# Altium PCB Main_PCB_V1R0_XXXXXX.PcbDoc
Units mil, origin at the board's own origin, x right, y up, seen from the top; angles counter-clockwise.
Board outline 4317.25 x 7815.17 mil, 2 copper layers (Top Layer, Bottom Layer), stack 58.66 mil thick; 91 components, 39 nets, 214 pads, 95 vias.
Unrouted connection lines stored in the file: 3.
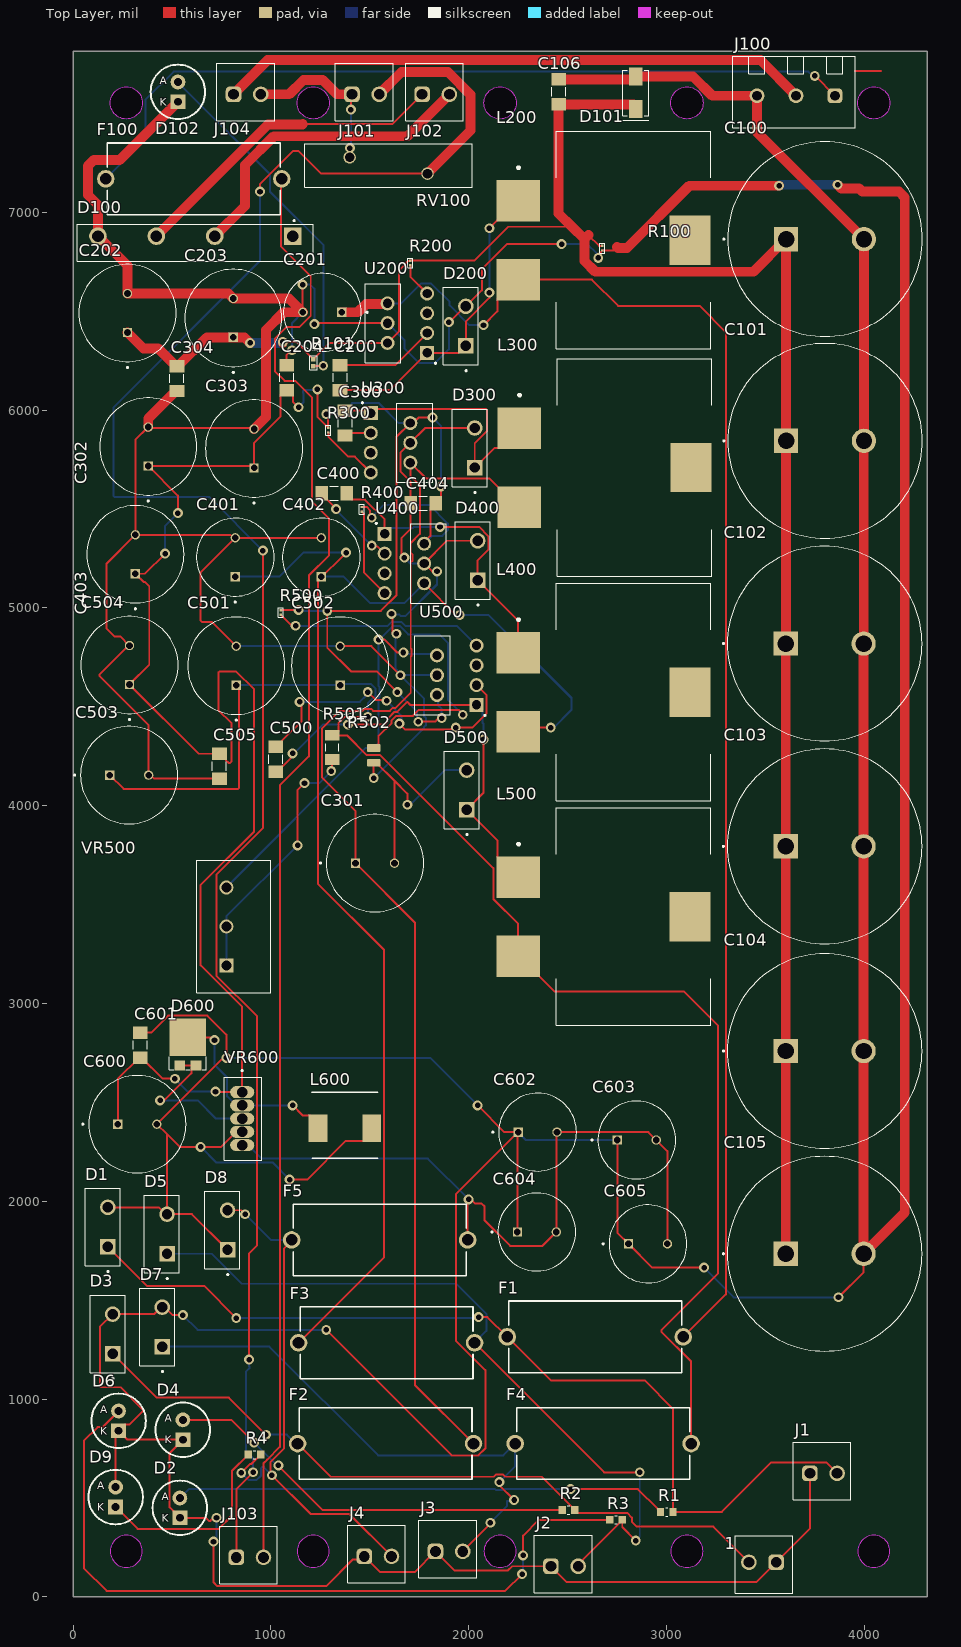
[diagram p0: Top Layer view]
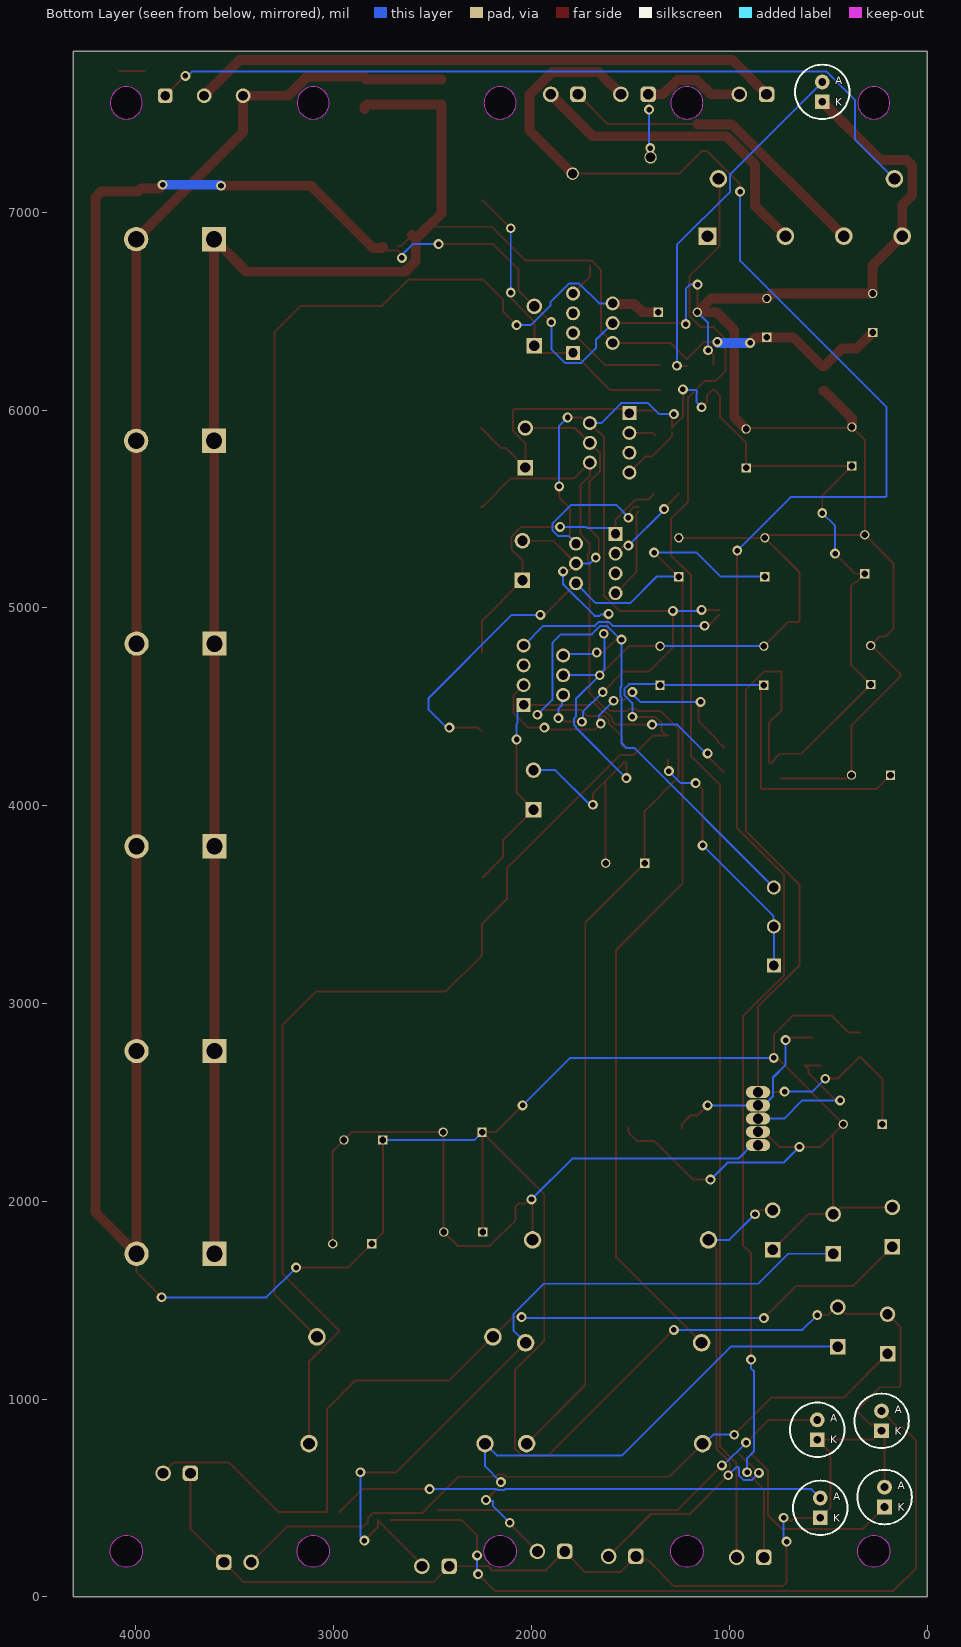
[diagram p1: Bottom Layer view, seen from below]
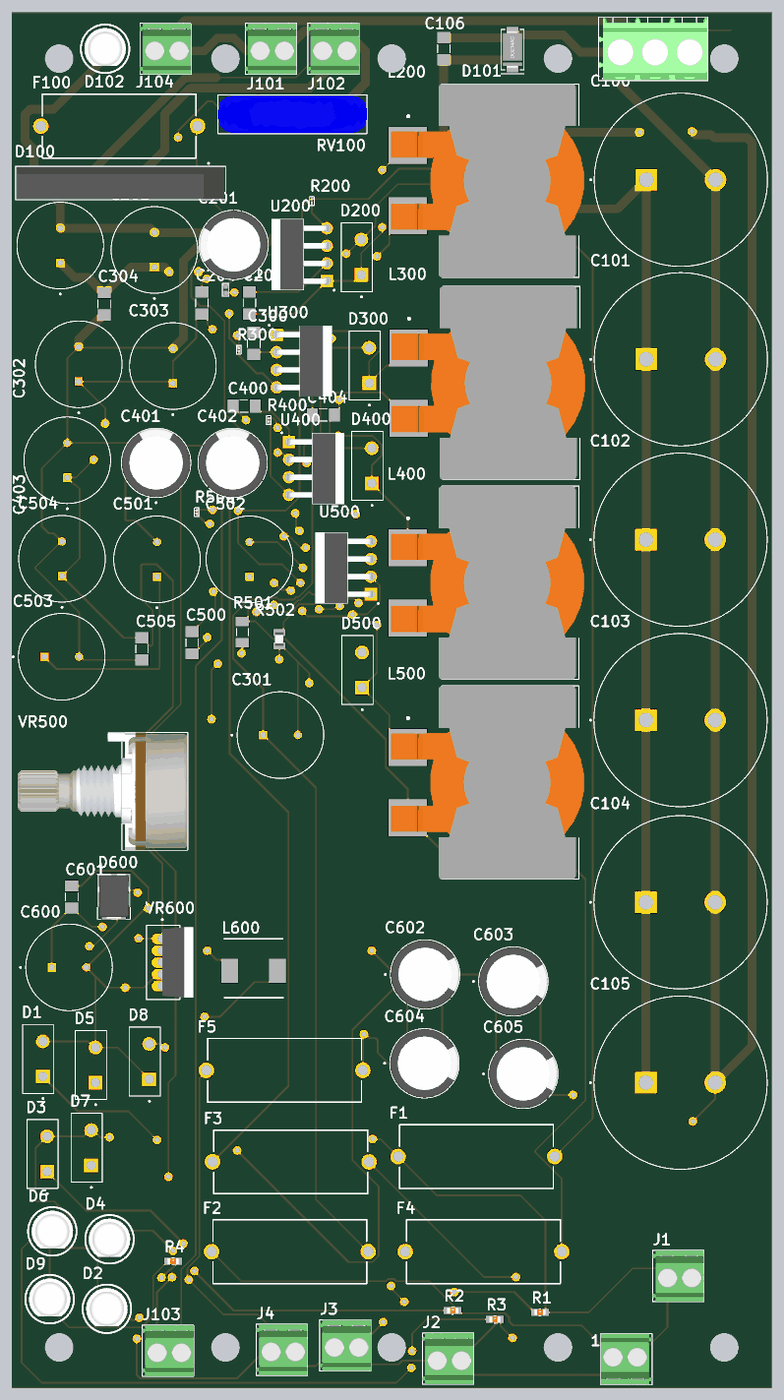
[diagram p2: 3D render of the assembled board from above, using the file's embedded part models]

## Layer stack, top to bottom
Top Solder: solder mask 0.4, Solder Resist, Dk 3.5
Top Layer: signal copper 1.18
Dielectric 1: dielectric 56.3, FR-4, Dk 4.8
Bottom Layer: signal copper 1.18
Bottom Solder: solder mask 0.4, Solder Resist, Dk 3.5

## Board outline
0.25,0.25 4317.5,0.25 4317.5,7815.42 0.25,7815.42
cut-out: 3967.26,230.66 ccw(c4048.64,230.66) 4048.64,149.28 ccw(c4048.64,230.66) 4130.02,230.66 ccw(c4048.64,230.66) 4048.64,312.04 ccw(c4048.64,230.66)
cut-out: 3022.38,230.66 ccw(c3103.76,230.66) 3103.76,149.28 ccw(c3103.76,230.66) 3185.13,230.66 ccw(c3103.76,230.66) 3103.76,312.04 ccw(c3103.76,230.66)
cut-out: 2077.5,230.66 ccw(c2158.87,230.66) 2158.87,149.28 ccw(c2158.87,230.66) 2240.25,230.66 ccw(c2158.87,230.66) 2158.87,312.04 ccw(c2158.87,230.66)
cut-out: 1132.61,230.66 ccw(c1213.99,230.66) 1213.99,149.28 ccw(c1213.99,230.66) 1295.37,230.66 ccw(c1213.99,230.66) 1213.99,312.04 ccw(c1213.99,230.66)
cut-out: 187.73,230.66 ccw(c269.11,230.66) 269.11,149.28 ccw(c269.11,230.66) 350.49,230.66 ccw(c269.11,230.66) 269.11,312.04 ccw(c269.11,230.66)
cut-out: 4048.64,7472.12 cw(c4048.64,7553.49) 3967.26,7553.49 cw(c4048.64,7553.49) 4048.64,7634.87 cw(c4048.64,7553.49) 4130.02,7553.49 cw(c4048.64,7553.49)
cut-out: 3103.76,7472.12 cw(c3103.76,7553.49) 3022.38,7553.49 cw(c3103.76,7553.49) 3103.76,7634.87 cw(c3103.76,7553.49) 3185.13,7553.49 cw(c3103.76,7553.49)
cut-out: 2158.87,7472.12 cw(c2158.87,7553.49) 2077.5,7553.49 cw(c2158.87,7553.49) 2158.87,7634.87 cw(c2158.87,7553.49) 2240.25,7553.49 cw(c2158.87,7553.49)
cut-out: 1213.99,7472.12 cw(c1213.99,7553.49) 1132.61,7553.49 cw(c1213.99,7553.49) 1213.99,7634.87 cw(c1213.99,7553.49) 1295.37,7553.49 cw(c1213.99,7553.49)
cut-out: 269.11,7472.12 cw(c269.11,7553.49) 187.73,7553.49 cw(c269.11,7553.49) 269.11,7634.87 cw(c269.11,7553.49) 350.49,7553.49 cw(c269.11,7553.49)

## Design rules (kind name [scope] priority, off if disabled: settings)
Clearance [All] p1: gap=10 ignorepadtopadclearanceinfootprint=FALSE
PolygonConnect [All] p1: connectstyle=Relief reliefconductorwidth=10 reliefentries=4 polygonreliefangle="90 Angle" airgapwidth=10
RoutingVias [All] p1: holewidth=28 width=50 viastyle="Through Hole" minholewidth=28 minwidth=50 maxholewidth=28 maxwidth=50
SolderMaskExpansion [All] p1: expansion=4 istentingtop=FALSE
SupplyNets "Schematic Supply Nets" [InNet('GND')] p1: voltage=0.000
Width [All] p1: maxlimit=200 minlimit=4 preferedwidth=50
30 further rules are at their usual default settings.

## Classes and differential pairs
component class "DC_DC ADJ": C500 C501 C502 C503 C504 C505 D500 L500 R500 R501 R502 U500 VR500
component class "DC_DC -12V": C600 C601 C602 C603 C604 C605 D600 L600 VR600
component class "DC_DC 12v": C200 C201 C202 C203 C204 D200 L200 R200 U200
component class "DC_DC 5v": C300 C301 C302 C303 C304 D300 L300 R300 U300
component class "DC_DC 3V3": C400 C401 C402 C403 C404 L400 R400 U400
component class "AC_DC CONVERTER": C100 C101 C102 C103 C104 C105 C106 D100 D101 D102 F100 J100 J101 J102 J103 J104 R100 R101 SW100
component class 000_HIERARCHICAL: 1 D1 D2 D3 D4 D5 D6 D7 D8 D9 F1 F2 F3 F4 F5 J1 J2 J3 J4 R1 R2 R3 R4

## Components (designator, comment, footprint, x,y, rotation, side; value= is the part's Value field where it differs from the comment)
1 "Con_2P" CON_2x1_TH_3.5mm_TB 3486.1,175 r180 top
C100 "MAL225638472E3" CAP_MAL225638472E3 3801.85,6865 r0 top
C101 "MAL225638472E3" CAP_MAL225638472E3 3801.85,5845 r0 top
C102 "MAL225638472E3" CAP_MAL225638472E3 3800,4820 r0 top
C103 "MAL225638472E3" CAP_MAL225638472E3 3800,3795 r0 top
C104 "MAL225638472E3" CAP_MAL225638472E3 3800,2760 r0 top
C105 "MAL225638472E3" CAP_MAL225638472E3 3800,1735 r0 top
C106 "100nF 100V" 1206#1 2455,7609.25 r90 top value=100nF
C200 "100nF 100V" 1206#1 1350,6165 r90 top value=100nF
C201 "EEUFR1V331U" CAPPRD500W60D1000H1250 1260,6495 r180 top
C202 "EEUFR1H561B" CAPPRD500W60D1250H2500 275,6491.57 r90 top
C203 "EEUFR1H561B" CAPPRD500W60D1250H2500 810,6466.57 r90 top
C204 "100nF 100V" 1206#1 1080,6165 r90 top value=100nF
C300 "100nF 100V" 1206#1 1375,5935 r270 top value=100nF
C301 "EEUFR1H561B" CAPPRD500W60D1250H2500 1526.57,3710 r0 top
C302 "EEUFR1H561B" CAPPRD500W60D1250H2500 379.99,5816.57 r90 top
C303 "EEUFR1H561B" CAPPRD500W60D1250H2500 915,5806.57 r90 top
C304 "100nF 100V" 1206#1 525,6160 r270 top value=100nF
C400 "100nF 100V" 1206#1 1320,5580 r180 top value=100nF
C401 "EEUFR1V331U" CAPPRD500W60D1000H1250 820,5256.57 r90 top
C402 "EEUFR1V331U" CAPPRD500W60D1000H1250 1255,5256.57 r90 top
C403 "EEUFR1H561B" CAPPRD500W60D1250H2500 314.99,5271.57 r90 top
C404 "100nF 100V" 1206#1 1770,5530 r180 top value=100nF
C500 "100nF 100V" 1206#1 1025,4235 r90 top value=100nF
C501 "EEUFR1H561B" CAPPRD500W60D1250H2500 825,4708.43 r90 top
C502 "EEUFR1H561B" CAPPRD500W60D1250H2500 1350,4708.43 r90 top
C503 "EEUFR1H561B" CAPPRD500W60D1250H2500 283.46,4155 r0 top
C504 "EEUFR1H561B" CAPPRD500W60D1250H2500 285,4711.57 r90 top
C505 "100nF 100V" 1206#1 740,4200 r270 top value=100nF
C600 "EEUFR1H561B" CAPPRD500W60D1250H2500 325,2390 r0 top
C601 "100nF 100V" 1206#1 340,2790 r90 top value=100nF
C602 "EEUFR1V331U" CAPPRD500W60D1000H1250 2348.43,2350 r0 top
C603 "EEUFR1V331U" CAPPRD500W60D1000H1250 2850,2310 r0 top
C604 "EEUFR1V331U" CAPPRD500W60D1000H1250 2345,1845 r0 top
C605 "EEUFR1V331U" CAPPRD500W60D1000H1250 2906.57,1785 r0 top
D1 "MBRF1045" TO508P995X450X1960-2 150,1870 r90 top
D2 "LED" LED_5MM 540,450 r0 top
D3 "MBRF1045" TO508P995X450X1960-2 174.21,1330 r90 top
D4 "LED" LED_5MM 555,845 r0 top
D5 "MBRF1045" TO508P995X450X1960-2 449.21,1835 r90 top
D6 "LED" LED_5MM 230,890 r0 top
D7 "MBRF1045" TO508P995X450X1960-2 425,1365 r90 top
D8 "MBRF1045" TO508P995X450X1960-2 755,1855 r90 top
D9 "LED" LED_5MM 215,505 r0 top
D100 "GBJ2510-F" DIOB_GBJ2510-F 617.87,6846.54 r180 top
D101 "38.9V  10.3A" DO_214AC 2845,7605 r90 top
D102 "LED" LED_5MM 530,7609.25 r0 top
D200 "MBRF1045" TO508P995X450X1960-2 1960,6425 r90 top
D300 "MBRF1045" TO508P995X450X1960-2 2005,5810 r90 top
D400 "MBRF1045" TO508P995X450X1960-2 2020,5240 r90 top
D500 "MBRF1045" TO508P995X450X1960-2 1964.21,4080 r90 top
D600 "SS5P6-M3/86A" TO-277A(SMPC) 580,2795 r0 top
F1 "696101000002" 696101000002 2640,1315 r180 top
F2 "696101000002" 696101000002 1579.88,775 r180 top
F3 "696101000002" 696101000002 1585,1285 r180 top
F4 "696101000002" 696101000002 2679.88,775 r180 top
F5 "696101000002" 696101000002 1550,1805 r180 top
F100 "696101000002" 696101000002 610,7170 r0 top
J1 "12V" CON_2x1_TH_3.5mm_TB 3793.9,625 r0 top
J2 "3V3" CON_2x1_TH_3.5mm_TB 2485,155 r0 top
J3 "VADJ" CON_2x1_TH_3.5mm_TB 1901.1,230 r0 top
J4 "-12V" CON_2x1_TH_3.5mm_TB 1541.1,205 r0 top
J100 "Conn 3POS" CON_3x1_TH_5mm 3655,7590 r180 top
J101 "Con_2P" CON_2x1_TH_3.5mm_TB 1478.9,7597.25 r0 top
J102 "Con_2P" CON_2x1_TH_3.5mm_TB 1833.9,7597.25 r0 top
J103 "Con_2P" CON_2x1_TH_3.5mm_TB 893.9,200 r0 top
J104 "Con_2P" CON_2x1_TH_3.5mm_TB 880,7597.25 r0 top
L200 "SER2918H-333KL" IND_SER2918H-333KL 2815,6860 r270 top
L300 "L1 22uH" IND_SER2918H-333KL 2820.16,5710.2 r270 top
L400 "22uH" IND_SER2918H-333KL 2815,4575 r270 top
L500 "SER2918H-333KL" IND_SER2918H-333KL 2815,3440 r270 top
L600 "100uH 2.5A" L_2SMD_8x8.5x5MM_NS 1238.35,2370 r0 top value=100uH
R1 "2k2 1/10W" 0603 3001.5,430 r0 top value=2k2
R2 "2k2 1/10W" 0603 2505,440 r0 top value=680
R3 "2k2 1/10W" 0603 2745,390 r0 top value=270
R4 "2k2 1/10W" 0603 916.5,720 r0 top value=2k2
R100 "1k 1/20W" 0201 2675,6820 r90 top value=1k
R101 "4k7 1/16W" 0402 1215,6240 r90 top value=4k7
R200 "1k 1/20W" 0201 1705,6745 r90 top value=1k
R300 "1k 1/20W" 0201 1290,5900 r90 top value=1k
R400 "1k 1/20W" 0201 1460,5500 r90 top value=1k
R500 "1k 1/20W" 0201 1050,4977.8 r90 top value=1k
R501 "0R33 3/4W" 1206#2 1310,4295 r90 top value=0.33R
R502 "866" RES_0805 1520,4255 r90 top
RV100 "" VAR_B72220S0301K101 1595,7237.3 r0 top
U200 "LM2678T-12" TO127P1041X469X2199-7N 1590,6440 r90 top
U300 "LM2678T-5" TO127P1041X469X2199-7N 1705,5835 r270 top
U400 "LM2678T-3V3" TO127P1041X469X2199-7N 1775,5225 r270 top
U500 "LM2678-ADJ" TO127P1041X469X2199-7N 1840,4660 r90 top
VR500 "10k 1/5W" Pot_3x1_5mm_TH 775,3390 r180 top value=10k
VR600 "LM2576HVT  -12V" TO170P1067X483X1651-5 855,2418.07 r270 top

## Footprints (in the part's own frame and the unit in brackets; to place one, negate y for a bottom-side part, rotate by r counter-clockwise, add the part's x,y. Pads: shape width x height; smd on the part's side, far side on the other; paste and mask are expansions set on the pad)
0201 [mm] "20211214 / A-F.Romo"
  rect 0.3x0.3 smd: 1(-0.325,0) 2(0.275,0)
  silkscreen extent -0.65,-0.32 0.61,0.33, body extent -0.32,-0.17 0.32,0.17, height 0.27
0402 [mm] "1005 Metric / 20190222 / N-A.Potosi"
  rect 0.6x0.6 smd: 1(-0.45,0) 2(0.45,0)
  silkscreen extent -0.92,-0.47 0.92,0.47, body extent -0.5,-0.25 0.5,0.25, height 0.25
0603 [mil] "1608 Metric / 20190222 / N-A.Potosi"
  rect 37x40 smd: 1(-31.5,0) 2(31.5,0)
  silkscreen extent -6,-21 6,20, body extent -31,-16 32,16, height 12
1206#1 [mm] "3216 Metric / 20190221 / C-A.Serna.A"
  rect 1.6x1.9 smd: 1(-1.6,0) 2(1.6,0)
  silkscreen extent -0.55,-0.9 0.57,0.9, body extent -1.6,-0.8 1.6,0.8, height 2
1206#2 [mm] "3216 metric/ 20190327/ V-A.Patino"
  rect 1.35x1.9 smd: 1(-1.55,0) 2(1.55,0)
  silkscreen extent -0.5,-0.85 0.5,0.85, body extent -1.67,-0.87 1.67,0.87, height 0.75
696101000002 [mm]
  round 2.25 hole 1.5: 1(-11.3,0) 2(11.3,0)
  silkscreen extent -11.1,-4.6 11.1,4.6
CAP_MAL225638472E3 [mm]
  rect 3.116x3.116 / inner round 3.116 / far side rect 3.116x3.116 hole 2.1: 1(-5,0)
  round 3.116 hole 2.1: 2(5,0)
  silkscreen extent -13.1,-12.5 12.5,12.5
CAPPRD500W60D1000H1250 [mm]
  round 1.2 hole 0.85: N(2.5,0)
  rect 1.2x1.2 hole 0.85: P(-2.5,0)
  silkscreen extent -5.85,-5 5,5, body extent -5,-5 5,5, height 12.5
CAPPRD500W60D1250H2500 [mm]
  round 1.2 hole 0.85: N(2.5,0)
  rect 1.2x1.2 / inner round 1.2 / far side rect 1.2x1.2 hole 0.85: P(-2.5,0)
  silkscreen extent -7.1,-6.25 6.25,6.25
CON_2x1_TH_3.5mm_TB [mm] "/ 20190222 / C-A.Serna.A"
  rrect50% 2x2 hole 1.397: 1(-1.75,0)
  round 2 hole 1.397: 2(1.75,0)
  silkscreen extent -3.87,-3.4 3.53,4, body extent -3.87,-3.4 3.53,4, height 8.6
CON_3x1_TH_5mm [mm] "/ 20190222 / C-A.Serna.A"
  rrect50% 1.9x1.9 hole 1.27: 1(-5,0)
  round 1.9 hole 1.27: 2(0,0) 3(5,0)
  silkscreen extent -7.6,-5.08 8.15,4.1, body extent -7.51,-4.99 8.06,4.01, height 11.7
DIOB_GBJ2510-F [mm]
  rect 2.27x2.27 hole 1.51: 1(-12.5,-0.85)
  round 2.27 hole 1.51: 2(-2.5,-0.85) 3(5,-0.85) 4(12.5,-0.85)
  silkscreen extent -15.15,-2.95 15.15,2.4, body extent -15,-2.3 15,2.3, height 24.5
DO_214AC [mm] "SMA / 20190221 / C-A.Serna.A"
  rect 2.3x1.7 smd: 1(-2.1,0) 2(2.1,0)
  silkscreen extent -3.5,-1.66 2.92,1.66, body extent -2.74,-1.4 2.74,1.4, height 2.3
IND_SER2918H-333KL [mm]
  rect 5.33x5.59 smd: 1(-5.075,-14.355) 2(5.075,-14.355)
  rect 6.35x5.28 smd: 3(0,7.72)
  silkscreen extent -13.95,-14.45 13.95,10.36, body extent -13.95,-16.8 13.95,11.14, height 17.78
L_2SMD_8x8.5x5MM_NS [mm] "NS Inductor/20230724/L-A.Rodriguez"
  rect 2.4x3.5 smd: 1(0,0) 2(6.9,0)
  silkscreen extent -0.79,-3.86 7.69,4.62, body extent -0.8,-3.6 7.7,4.4, height 5
LED_5MM [mm]
  round 1.9 hole 1: A(0,1.27)
  rect 1.9x1.9 hole 1: K(0,-1.27)
  silkscreen extent -3.5,-3.5 3.5,3.5, body extent -3,-2.5 3,3, height 21.8
Pot_3x1_5mm_TH [mm] "20190528/ V-A.Patino"
  rect 1.8x1.8 hole 1.27: 1(0,5)
  round 1.8 hole 1.27: 2(0,0) 3(0,-5)
  silkscreen extent -5.7,-8.5 3.8,8.5, body extent -5.64,-8.55 18.86,8.45, height 21
RES_0805 [mm]
  rrect25% 1x1.7 smd: 1(-0.95,0) 2(0.95,0)
  body extent -1,-0.63 1,0.63, height 0.47
TO127P1041X469X2199-7N [mm]
  rect 1.8x1.8 / inner round 1.8 / far side rect 1.8x1.8 hole 1.2: 1(-3.81,-5.08)
  round 1.8 hole 1.2: 2(-2.54,0) 3(-1.27,-5.08) 4(0,0) 5(1.27,-5.08) 6(2.54,0) 7(3.81,-5.08)
  silkscreen extent -5.25,-6.25 5.08,2.86, body extent -5.08,-5.27 5.08,2.87, height 20.9
TO170P1067X483X1651-5 [mm]
  oval 1.55x3.1 hole 1.34: 1(-3.4,0) 2(-1.7,0) 3(0,0) 4(1.7,0) 5(3.4,0)
  silkscreen extent -6.27,-2.29 5.34,2.54, body extent -5.08,0 5.08,4.45, height 16.84
TO508P995X450X1960-2 [mm]
  rect 1.995x1.995 hole 1.33: 1(-2.54,-0.655)
  round 1.995 hole 1.33: 2(2.54,-0.655)
  silkscreen extent -5.82,-2.25 4.97,2.25
TO-277A(SMPC) [mm]
  rect 1.4x1.3 smd: A1(-1.04,-2.725) A2(1.04,-2.725)
  rect 4.72x4.8 smd: K(0,0.875)
  silkscreen extent -2.37,-3.32 2.37,-1.63, body extent -2.3,-3.25 2.3,3.25, height 1.2
VAR_B72220S0301K101 [mm]
  round 1.6 hole 1.25: 1(-5,1.05) 2(5,-1.05)
  silkscreen extent -10.75,-2.8 10.75,2.8, body extent -10.75,-2.7 10.75,2.7, height 25.5

## Part data
1 J1 J2 J3 J4 J101 J102 J103 J104: library part Con_2x1_TH_3.5mm, "TERM BLK 2POS SIDE ENT 3.5MM PCB", Manufacturer="Würth Elektronik", Manufacturer Part Number=691214110002, Supplier Part Number 1=732-2747-ND, ComponentLink1Description=Digi-key, ComponentLink1URL=https://www.digikey.com/product-detail/en/wurth-electronics-inc/691214110002/732-2747-ND/2508516, Last modified by=J.Jaramillo, Last modified date=20240310, Reel Stock=N/A, Supplier 1=Digi-Key
C100 C101 C102 C103 C104 C105 C202 C203 C301 C302 C303 C403 C501 C502 C503 C504 C600 D1 D3 D5 D7 D8 D200 D300 D400 D500 F1 F2 F3 F4 F5 F100: Package=None, Availability=Unavailable, Price=None
  C100 C101 C102 C103 C104 C105: MP=MAL225638472E3
  C202 C203 C301 C302 C303 C403 C501 C502 C503 C504 C600: MF="{'manufacturer': u'Panasonic Electronic Components'}", MP=EEUFR1H561B
  D1 D3 D5 D7 D8 D200 D300 D400 D500: MP=MBRF1045
  F1 F2 F3 F4 F5 F100: MF="{'manufacturer': u'W\xfcrth Elektronik'}", MP=696101000002
C106 C200 C204 C300 C304 C400 C404 C500 C505 C601: library part Cap_0.1uF_1206_100V, "CAP CER 0.1UF 100V X7R 1206", Manufacturer="Samsung Electro-Mechanics", Manufacturer Part Number=CL31B104KCFNNNE, Supplier Part Number 1=1276-1151-1-ND, ComponentLink1Description=Digi-Key, ComponentLink1URL=https://www.digikey.com/en/products/detail/samsung-electro-mechanics/CL31B104KCFNNNE/3886809, Last modified by=J.Jaramillo, Last modified date=20240309, Supplier 1=Digi-Key
C201 C401 C402 C602 C603 C604 C605: "CAP ALUM 330UF 20% 35V RADIAL TH", Package="RADIAL-2 Panasonic", Availability="In Stock", Check_prices=https://www.snapeda.com/parts/EEUFR1V331U/Panasonic/view-part/?ref=eda, MF=Panasonic, MP=EEUFR1V331U, Price=None, Purchase-URL=https://pricing.snapeda.com/search/part/EEUFR1V331U/?ref=eda, SnapEDA_Link=https://www.snapeda.com/parts/EEUFR1V331U/Panasonic/view-part/?ref=snap
D2 D4 D6 D9 D102: library part LED_5MM_GENERIC_THT, "5mm LED Generic THT"
D100: "Bridge Rectifier Single Phase Standard 1 kV Through Hole GBJ", Package="SIP-4 Diodes Incorporated", Check_prices=https://www.snapeda.com/parts/GBJ2510-F/Diodes+Inc./view-part/?ref=eda, Digi-Key_Part_Number=GBJ2510-FDI-ND, MF="Diodes Inc.", MP=GBJ2510-F, Purchase-URL=https://pricing.snapeda.com/search/part/GBJ2510-F/?ref=eda, SnapEDA_Link=https://www.snapeda.com/parts/GBJ2510-F/Diodes+Inc./view-part/?ref=snap
D101: library part TVS_38.9V_1CH_DO_214AC, "TVS DIODE 24VWM 38.9VC SMA", Manufacturer="Bourns Inc.", Manufacturer Part Number=SMAJ24CA, Supplier Part Number 1=SMAJ24CABCT-ND, ComponentLink1Description=Digi-Key, ComponentLink1URL=https://www.digikey.com/en/products/detail/bourns-inc/SMAJ24CA/2254533, Last modified by=J.Jaramillo, Last modified date=20220603, Reel Sotck=N/A, Supplier 1=Digi-Key
D600: "Diode,Schottky Barrier,Vr 60V,If 5A,Pkg TO-277A,Vf 0.56V,Cj 200pF,Tj +150degc", Package="TO-277 Vishay", Check_prices=https://www.snapeda.com/parts/SS5P6-M3/86A/Vishay/view-part/?ref=eda, MF="Vishay General Semiconductor", MP=SS5P6-M3/86A, SnapEDA_Link=https://www.snapeda.com/parts/SS5P6-M3/86A/Vishay/view-part/?ref=snap
J100: library part Con_3x1_TH_5.0mm, "TERM BLK 3POS SIDE ENTRY 5MM PCB", Manufacturer="Phoenix Contact", Manufacturer Part Number=1935174, Supplier Part Number 1=277-1578-ND, ComponentLink1Description=Digi-Key, ComponentLink1URL=https://www.digikey.com/product-detail/en/phoenix-contact/1935174/277-1578-ND/568615, Last modified by=J.Jaramillo, Last modified date=20240310, Reel Stock=N/A, Supplier 1=Digi-Key
L200 L500: "INDUCTOR, PWR, 33UH, 28A, 0.1, 10MHZ; Product Range:COILCRAFT - SER2900 Series; Inductance:33ÂµH; Inductance Tolerance:Â± 10%; Inductor Construction:Shielded; DC Resistance Max:2860Âµohm; RMS Current (Irms):28A; Saturation Current (Isat):7A; Case Dimensio", Package=None, Check_prices=https://www.snapeda.com/parts/SER2918H-333KL/Coilcraft/view-part/?ref=eda, MF=Coilcraft, MP=SER2918H-333KL, SnapEDA_Link=https://www.snapeda.com/parts/SER2918H-333KL/Coilcraft/view-part/?ref=snap
L300 L400: library part SER2918H-333KL, "INDUCTOR, PWR, 33UH, 28A, 0.1, 10MHZ; Product Range:COILCRAFT - SER2900 Series; Inductance:33ÂµH; Inductance Tolerance:Â± 10%; Inductor Construction:Shielded; DC Resistance Max:2860Âµohm; RMS Current (Irms):28A; Saturation Current (Isat):7A; Case Dimensio", Package=None, Check_prices=https://www.snapeda.com/parts/SER2918H-333KL/Coilcraft/view-part/?ref=eda, MF=Coilcraft, MP=SER2918H-333KL, SnapEDA_Link=https://www.snapeda.com/parts/SER2918H-333KL/Coilcraft/view-part/?ref=snap
L600: library part L_100uH_2.5A_NS, "2.5A 100uH ±20% 3A SMD,8x8.5mm Power Inductors ROHS", Manufacturer="PROD Tech", Manufacturer Part Number=PSPMAA0805-101M-ANP, Supplier Part Number 1=C2962892, ComponentLink1Description=Digi-Key, ComponentLink1URL=https://www.digikey.com/en/products/detail/bourns-inc/SRR1280-101M/2127044, Last modified by=J.Jaramillo, Last modified date=20240310, Reel Stock=N/A, Supplier 1=LCSC
R1 R2 R3 R4: library part Res_2k2_0603_1/10W, "RES SMD 2.2K OHM 1% 1/10W 0603", Manufacturer=Yageo, Manufacturer Part Number=RC0603FR-072K2L, Supplier Part Number 1=311-2.20KHRCT-ND, ComponentLink1Description=Digi-Key, ComponentLink1URL=https://www.digikey.com/en/products/detail/yageo/RC0603FR-072K2L/727016?s=N4IgTCBcDaIEoGEAMA2JBmAYnAtEg7GANJgAyIAugL5A, Last modified by=J.Jaramillo, Last modified date=20240310, Reel Stock=N/A, Supplier 1=Digi-Key
R100 R200 R300 R400 R500: library part Res_1k_0201_1/20W, "RES 1K OHM 1% 1/20W 0201", Manufacturer=YAGEO, Manufacturer Part Number=RC0201FR-071KL, Supplier Part Number 1=311-1KMCT-ND, ComponentLink1Description=Digi-Key, ComponentLink1URL=https://www.digikey.com/en/products/detail/yageo/RC0201FR-071KL/3202389?s=N4IgTCBcDaIMwEYEFoEGkCyBhAKsgcgCIgC6AvkA, Last modified by=J.Jaramillo, Last modified date=20240310, Reel Stock=N/A, Supplier 1=Digi-Key
R101: library part Res_4k7_0402_1/16W, "RES SMD 4.7K OHM 5% 1/16W 0402", Manufacturer=Yageo, Manufacturer Part Number=RC0402JR-074K7L, Supplier Part Number 1=311-4.7KJRCT-ND, ComponentLink1Description=Digi-Key, ComponentLink1URL=https://www.digikey.com/product-detail/en/yageo/RC0402JR-074K7L/311-4-7KJRCT-ND/729424, Last modified by=J.Jaramillo, Last modified date=20240310, Reel Stock=N/A, Supplier 1=Digi-Key
R501: library part Res_0R33_1206_3/4W, "RES 0.33 OHM 1% 3/4W 1206", Manufacturer=Susumu, Manufacturer Part Number=KRL1632E-M-R330-F-T5, Supplier Part Number 1=408-1588-1-ND, ComponentLink1Description=Digi-key, ComponentLink1URL=https://www.digikey.com/products/en?keywords=408-1588-1-ND, Last modified by=J.Jaramillo, Last modified date=20240310, Reel Stock=N/A, Supplier 1=Digi-Key
R502: library part RES_0805, "Resistor SMD 0805"
RV100: library part B72220S0301K101, "Varistor: metal-oxide; THT; 300VAC; 385VDC; 470V; 8000A; 173J", Package="Disc-20 EPCOS - TDK Electronics", Check_prices=https://www.snapeda.com/parts/B72220S0301K101/EPCOS/view-part/?ref=eda, MF=EPCOS, MP=B72220S0301K101, SnapEDA_Link=https://www.snapeda.com/parts/B72220S0301K101/EPCOS/view-part/?ref=snap
U200 U300 U400 U500: library part LM2678T-ADJ, "8V to 40V, 5A SIMPLE SWITCHER buck converter with high efficiency 7-TO-220 -40 to 125", Package="TO-220-7 Texas Instruments", Check_prices=https://www.snapeda.com/parts/LM2678T-ADJ/Texas+Instruments/view-part/?ref=eda, MF="Texas Instruments", MP=LM2678T-ADJ, SnapEDA_Link=https://www.snapeda.com/parts/LM2678T-ADJ/Texas+Instruments/view-part/?ref=snap
VR500: library part Pot_10k_1/5W_TH, "POT 10K OHM 1/5W PLASTIC LINEAR", Manufacturer="TT Electronics/BI", Manufacturer Part Number=P160KN-0QC15B10K, Supplier Part Number 1=987-1301-ND, ComponentLink1Description=Digi-key, ComponentLink1URL=https://www.digikey.com/products/en?keywords=P160KN-0QC15B10K, Last modified by=J.Jaramillo, Last modified date=20240310, Reel Stock=N/A, Supplier 1=Digi-Key
VR600: library part LM2576HVT-ADJ/NOPB, "SIMPLE SWITCHERÂ® 4V to 60V, 3A Low Component Count Step-Down Regulator", Package="TO-220-5 Texas Instruments", Check_prices=https://www.snapeda.com/parts/LM2576HVT-ADJ/NOPB/Texas+Instruments/view-part/?ref=eda, MF="Texas Instruments", MP=LM2576HVT-ADJ/NOPB, SnapEDA_Link=https://www.snapeda.com/parts/LM2576HVT-ADJ/NOPB/Texas+Instruments/view-part/?ref=snap

## Via types
v1: diameter 50, hole 28, Top Layer to Bottom Layer, 95 vias

## Nets (pads, with @x,y where several pads share a name; then routed paths per layer and width w, separated by ;. In a path a pad name is that pad's centre, name@x,y a point inside that pad or via, vN(x,y) a via of type N, cw(c..) or ccw(c..) an arc to the next point about the centre after c; other vN are vias at no path point)
3V3_INT: C401.P C402.P F3.2 L400.2 U400.6 | length 6967.5
  Top Layer w10: F3.2 1572.24,1717.13 1572.24,3270.67 1237.6,3605.32 1237.6,5137.6 v1(1380,5280) ; U400.6 1940.86,4959.14 1949.14,4959.14 v1(1955,4965) ; L400.2 2269.65,4395 v1(2415,4395)
  Bottom Layer w10: C401.P 1042.97,5158.15 1164.82,5280 v1(1380,5280) ; C402.P 1367.96,5158.15 1501.55,5024.57 1674.57,5024.57 U400.6 ; v1(1955,4965) 2100,4965 2520,4545 2520,4485 2426.64,4391.64 2418.36,4391.64 v1(2415,4395)
GND: 1.1 C100.2 C101.2 C102.2 C103.2 C104.2 C105.2 C106.2 C201.N C202.N C203.N C204.2 C301.N C302.N C303.N C304.2 C401.N C402.N C403.N C404.2 C501.N C502.N C503.N C504.N C505.2 C600.N C601.2 C602.P C603.P C604.P C605.P D1.2 D2.K D3.2 D4.K D5.2 D6.K D7.2 D8.1 D9.A D100.4 D101.2 D102.K D200.2 D300.2 D400.2 D500.2 J1.1 J2.1 J3.1 J4.1 J100.3 L600.2 R100.1 R502.1 U200.4 U300.4 U400.4 U500.4 VR600.4 | length 48532.3
  Top Layer w10: D1.2 433.25,1970 468.25,1935 D5.2 ; D9.A 215,825 D6.K ; C601.2 394.94,2853 480.87,2938.94 679.13,2938.94 775,2843.06 v1(775,2725) 758.43,2725 C600.N 475,2338.43 ; v1(555,1425) 502.85,1425 462.85,1465 D7.2 444.04,1465 409.04,1430 D3.2 135,1365 135,1065.86 140.86,1060 240.3,1060 352.98,947.33 352.98,939.04 286.34,872.4 262.4,872.4 D6.K ; v1(710,280) 710,75 730,55 1280,55 1415.31,190.31 1457.52,190.31 J4.1 1552.2,125 1727.2,125 J3.1 1927.92,134.28 2198.8,134.28 2219.51,155 J2.1 2496.1,75 3455,75 1.1 3725,345 J1.1 ; v1(725,400) 717.35,392.35 702.35,392.35 694.14,384.14 685.86,384.14 670,400 D2.K 487.6,452.4 487.6,727.6 D4.K 275,795 D6.K ; C505.2 409.97,4137 391.97,4155 C503.N 381.89,4408.11 134.14,4655.86 134.14,4664.14 280,4810 C504.N 238.94,4856.06 208.94,4856.06 170,4895 170,5225.01 C403.N ; D8.1 600.79,1935 D5.2 ; C501.N 701.85,4930 650.86,4930 645,4935.86 645,5180 C401.N ; VR600.4 824.49,2351.14 748.35,2275 v1(645,2275) 538.43,2275 475,2338.43 ; C303.N 910,5910 384.99,5910 C302.N 314.99,5850 C403.N ; C204.2 1080,6280 1103.37,6303.37 v1(1107.52,6303.37) ; v1(1095,2110) 1183.33,2110 1379.43,2306.1 1467.76,2306.1 1510,2348.35 L600.2 ; v1(1160,6635) 1160.79,6634.21 1160.79,6495.79 C201.N ; v1(1220,6435) 1225,6440 U200.4 ; C402.N C401.N ; v1(1280,1350) 1914.29,715.71 2049.32,715.71 2084.06,750.44 2084.06,1146.98 1935.59,1295.44 1935.59,2035.59 C602.P@2246.57,2346.57 ; C502.N 1508.15,4806.85 v1(1655,4660) ; v1(1520,4140) R502.1 1533.78,4217.6 1625,4126.38 ; v1(1609.95,4970) 1615,4964.95 1615,4870 v1(1635,4870) ; C301.N 1625,4126.38 ; v1(1675,5255) 1665.86,5255 1660,5260.86 1660,5352.8 1707,5399.8 C404.2 1707,5639.03 1654.57,5691.46 1654.57,5784.57 U300.4 1780,5910 D300.2 ; v1(1690,4005) 1690,4061.38 1625,4126.38 ; v1(1840,5185) 1815,5185 U400.4 1890,5340 D400.2 ; v1(1900,6445) 1902.89,6445 1982.89,6525 D200.2 2066.25,6605.46 2066.25,6712.77 2193.47,6840 v1(2470,6840) ; v1(2045,2485) 2180,2350 C602.P C602.P@2246.57,2346.57 ; C604.P C602.P@2246.57,2346.57 ; v1(2654.93,6769.93) 2662.58,6777.58 2662.58,6794.78 R100.1 2732.2,6807.2 2750,6825 ; C603.P 2751.57,1841.57 C605.P 2928.15,1665 v1(3190,1665) ; v1(3870,1515) 3996.85,1641.85 C105.2 ; C403.N 794.92,5370 809.92,5355 C401.N ; D5.2 475,2338.43
  Top Layer w50: C302.N 379.99,5957.89 519.1,6097 C304.2 ; D102.K 235.75,7265 104.29,7265 75,7235.71 75,7088.56 125.75,7037.81 D100.4 275,6730.75 C202.N 785,6590 C203.N 1091.57,6565 C201.N@1160.79,6495.79 ; C303.N 975,5965 975,6405 1065,6495 C201.N ; C106.2 2836.54,7672.25 2845,7680.72 D101.2 3134.16,7687.68 3231.83,7590 J100.3 3458.15,7405.55 C100.2 C101.2 3997.78,5844.07 3997.78,4820.93 C102.2 C103.2 C104.2 C105.2 4205,1943.15 4205,7075.71 4175.71,7105 3990,7105 3975,7120 3885,7120 v1(3865,7140) ; 2750,6825 2755,6820 2800.5,6820 3115.5,7135 v1(3570,7135)
  Bottom Layer w10: v1(555,1425) 630,1350 v1(1280,1350) ; v1(645,2275) 723.67,2196.33 1008.67,2196.33 v1(1095,2110) ; v1(710,280) 725,295 v1(725,400) ; v1(775,2725) 1805,2725 v1(2045,2485) ; C501.N C502.N ; v1(1107.52,6303.37) 1107.52,6440.95 C201.N ; v1(1160,6635) 1200,6635 1220,6615 v1(1220,6435) ; v1(1520,4140) 1775,4395 1775,4398.43 1785,4408.43 1785,4441.57 1775,4451.57 1775,4540 v1(1655,4660) ; U200.4 1675,6355 1675,6312.92 1748.35,6239.57 1831.65,6239.57 1900,6307.92 v1(1900,6445) ; v1(1609.95,4970) 1613.85,4966.1 1649.95,4966.1 1656.05,4960 1681.32,4960 1840,5118.68 v1(1840,5185) ; v1(1635,4870) 1630,4865 1630,4691.57 1655,4666.57 v1(1655,4660) ; v1(1675,5255) 1705,5225 U400.4 ; v1(1690,4005) 1693.36,4001.64 1701.64,4001.64 1880,4180 D500.2 ; U500.4 v1(1655,4660) ; C602.P 2290,2310 C603.P ; v1(2470,6840) 2600,6840 2647.27,6792.73 2647.27,6777.58 v1(2654.93,6769.93) ; v1(3190,1665) 3340,1515 v1(3870,1515)
  Bottom Layer w50: v1(3570,7135) 3575,7140 v1(3865,7140)
Net1_2: 1.2 D3.1 F2.2 R2.2 | length 3677.3
  Top Layer w10: D3.1 422.14,1007.86 787.14,1007.86 v1(975,820) ; F2.2 1302.52,607.48 2125.91,607.48 2138.43,620 2171.57,620 2184.09,607.48 2370.52,607.48 2536.5,441.5 R2.2 ; R2.2@2536.5,438.5 2550,425 2801.21,425 2825.61,400.61 2825.61,379.39 2850,355 3237.2,355 1.2
  Bottom Layer w10: v1(975,820) 1080.84,820 1125.84,775 F2.2
NetC100_1: C100.1 C101.1 C102.1 C103.1 C104.1 C105.1 C106.1 C202.P C203.P C204.1 C302.P C303.P C304.1 C403.P C404.1 C504.P C505.1 C600.P C601.1 D100.1 D101.1 R100.2 R101.2 R200.2 R300.2 R400.2 R500.2 U200.2 U300.2 U400.2 U500.2 VR600.1 | length 22676.7
  Top Layer w10: C600.P 226.57,2619.49 334.09,2727 C601.1 345.9,2727 452.91,2620 v1(515,2620) ; v1(465,5275) 363.15,5173.15 C403.P 355.88,5132.26 362.74,5132.26 385,5110 385,4713.15 C504.P 635.15,4263 C505.1 745.91,4263 772.41,4236.5 772.41,4230.59 785.86,4217.14 794.14,4217.14 800,4223 800,4419 735,4484 735,4674.14 740.86,4680 823.46,4680 915,4588.46 915,3870 645,3600 645,3192.75 855,2982.75 VR600.1 853.46,2553.46 721.54,2553.46 v1(720,2555) ; v1(530,5480) 530,5568.14 C302.P 905,5718.15 C303.P 915,5834.84 1047.59,5967.44 1047.59,6075.51 1074.09,6102 C204.1 1085.22,6102 1111.72,6075.51 1111.72,6043.28 v1(1140,6015) ; R500.2 1050.69,4989.31 1139.31,4989.31 v1(1140,4990) ; v1@1060,6340 1065,6345 1127.72,6345 R101.2 1297.28,6340 U200.2 1648.17,6398.17 1648.17,6708.4 1694.69,6754.92 1704.09,6754.92 R200.2 2028.37,6755.83 2200.04,6927.5 2522.5,6927.5 ; v1(1235,6105) 1235,5965.83 R300.2 1290,5959.18 1280,5969.18 v1(1280,5980) ; R400.2 1483.91,5510.83 1502.35,5492.39 1502.35,5464.11 v1(1510,5456.46) ; v1(1640,4575) 1535,4680 1405,4680 1285,4800 v1(1285,4985) 1556.32,4985 1634.57,5063.24 1634.57,5864.57 U300.2 1720.03,5935 1748.18,5963.15 v1(1817.6,5963.15) ; v1(1745,4425) 1830,4425 1840,4435 1855.29,4435 v1(1863.75,4443.46) ; U400.2 1775,5333.32 1806.5,5364.82 1806.5,5503.5 C404.1 1859.49,5556.49 1859.49,5574.49 1860,5575 v1(1860,5615) ; 2605,6885 2659.17,6830.83 R100.2
  Top Layer w50: C202.P 356.83,6311.32 430.77,6311.32 519.1,6223 C304.1 530.91,6223 676.06,6368.15 C203.P 866.85,6368.15 v1(895,6340) ; v1@1060,6340 v1(1060,6345) ; 2605,6885 2585,6865 ; D101.1 2845,7534.13 2832.88,7546.25 C106.1 2455,6995 2522.5,6927.5 2585,6865 ; C105.1 C104.1 C103.1 C102.1 3604.07,4820.93 3604.07,5844.07 C101.1 C100.1 3440,6700 2640,6700 2585,6755 2585,6865
  Bottom Layer w10: v1(465,5275) 465,5415 v1(530,5480) ; v1(515,2620) 580,2555 v1(720,2555) ; v1(1140,4990) 1145,4985 v1(1285,4985) ; v1(1140,6015) 1165,6040 1165,6085 1162.14,6087.86 1162.14,6096.15 1168,6102 1232,6102 v1(1235,6105) ; v1(1280,5980) 1355,5980 1410.86,6035.86 1419.14,6035.86 1419.57,6035.43 1546.65,6035.43 1647.08,5935 U300.2 ; v1@1505,5455 1571.69,5521.69 1799.88,5521.69 1895,5426.57 1895,5393.43 1866.61,5365.04 1815.04,5365.04 U400.2 ; v1@1506.46,5456.46 v1(1510,5456.46) ; v1(1640,4575) 1740,4475 1740,4430 v1(1745,4425) ; v1(1817.6,5963.15) 1860,5920.74 v1(1860,5615) ; U500.2 1845.05,4554.95 1845.05,4509.57 1863.75,4490.86 v1(1863.75,4443.46)
  Bottom Layer w50: v1(895,6340) 1055,6340 v1(1060,6345)
NetC200_1: C200.1 D200.1 L200.1 U200.1 | length 1575.5
  Top Layer w10: C200.1 1602,6102 U200.1 1950.79,6290 D200.1 1985.79,6448.25 2105,6567.46 2105,6594.61 v1(2104.8,6594.81) ; v1(2105,6920) 2105,6920.08 2244.72,7059.8 L200.1
  Bottom Layer w10: v1(2104.8,6594.81) 2104.9,6594.91 2104.9,6919.9 v1(2105,6920)
NetC200_2: C200.2 U200.3 | length 507.1
  Top Layer w10: C200.2 1628,6228 U200.3
NetC201_P: C201.P F1.1 L200.2 U200.6 | length 7508.8
  Top Layer w10: v1(2075,6430) 2144.8,6499.8 2144.8,6560.28 2244.72,6660.2 L200.2 2623.23,6660.2 2755.83,6527.6 3167.4,6527.6 3300,6395 3300,1530.12 F1.1
  Top Layer w50: C201.P 1439.35,6495 1480.36,6536.01 1586.01,6536.01 U200.6
  Bottom Layer w10: U200.6 1658.46,6540 1758.9,6640.43 1810.89,6640.43 1903.64,6547.69 1903.64,6530.4 2004.04,6430 v1(2075,6430)
NetC300_1: C300.1 D300.1 L300.1 U300.1 | length 1358.1
  Top Layer w10: C300.1 1492,5998 U300.1 1525.87,6005.87 2087.72,6005.87 2093.58,6000.01 2093.58,5896.04 2030.79,5833.25 D300.1 2130.87,5810.08 2155.08,5810.08 L300.1
NetC300_2: C300.2 U300.3 | length 135.4
  Top Layer w10: C300.2 1388.01,5885 U300.3
NetC301_P: C301.P F2.1 L300.2 U300.6 | length 6320.2
  Top Layer w10: F2.1 1728.25,1071.51 1728.25,3409.9 C301.P 1428.15,3973.44 1257.6,4143.99 1257.6,4388.81 1348.63,4479.84 1463.27,4479.84 1473.43,4490 1506.57,4490 1516.73,4479.84 1601.7,4479.84 1616.86,4495 1631.32,4495 1707.19,4570.87 1707.19,4755.62 1710,4758.43 1710,4791.57 1707.19,4794.38 1707.19,5230.62 1715,5238.43 1715,5271.57 1707.19,5279.38 1707.19,5328.51 1753.49,5374.82 1753.49,5620.82 1705,5669.31 U300.6 1784.27,5655.73 2104.55,5655.73 2249.88,5510.39 L300.2
NetC400_1: C400.1 D400.1 L400.1 U400.1 | length 1577.1
  Top Layer w10: C400.1 1383,5574.09 1409.49,5547.59 1475.43,5547.59 1575,5448.02 U400.1 ; v1(1855,5410) 2052.54,5410 2100.06,5362.48 2100.06,5295.51 2045.79,5241.24 D400.1 2249.84,4935.94 L400.1
  Bottom Layer w10: U400.1 1605.43,5405.43 1718.69,5405.43 1723.26,5410 v1(1855,5410)
NetC400_2: C400.2 U400.3 | length 451.4
  Top Layer w10: C400.2 1257,5574.09 1330,5501.09 v1(1330,5500) ; v1(1510,5315) 1514.71,5310.29 1539.71,5310.29 U400.3
  Bottom Layer w10: v1(1330,5500) 1330,5495 v1(1510,5315)
NetC500_1: C500.1 D500.1 L500.1 U500.1 | length 2214.9
  Top Layer w10: C500.1 1030.9,4172 1102.35,4243.45 1102.35,4257.35 v1(1110,4265) ; v1(1390,4410) 1574.61,4410 1590,4425.39 1590,4439.85 1625.15,4475 1639.61,4475 1689.61,4525 1705.04,4509.57 1914.12,4509.57 1914.56,4510 U500.1 ; v1(2075,4335) 2075,4065 D500.1 2144.8,3825.2 2144.8,3739.72 2244.72,3639.8 L500.1
  Bottom Layer w10: v1(1110,4265) 1117.99,4265 1262.99,4410 v1(1390,4410) ; U500.1 2070.43,4479.57 2070.43,4418.81 2075,4414.24 v1(2075,4335)
NetC500_2: C500.2 U500.3 | length 1579.3
  Top Layer w10: C500.2 1030.9,4298 1057.4,4324.5 1057.4,4330.41 1155,4428.01 1155,4519.14 1149.14,4525 v1(1145,4525) ; v1(1490,4575) 1530,4535 1581.04,4535 v1(1585.09,4530.95) ; v1(1650,4415) 1680,4385 1909.14,4385 1911.49,4387.35 1927.35,4387.35 v1(1935,4395) 2017.08,4395 2090.43,4468.35 2090.43,4559.57 U500.3
  Bottom Layer w10: v1(1145,4525) 1450,4525 1485,4560 1485,4570 v1(1490,4575) ; v1@1585.09,4530.91 1660,4456 1660,4420.86 1654.14,4415 v1(1650,4415)
NetC501_P: C501.P C502.P C503.P F4.1 L500.2 R501.2 | length 7358.9
  Top Layer w10: C503.P 255.04,4085 834.14,4085 840,4090.86 840,4595 C501.P ; R501.2 R501.2@1320.83,4356.02 ; v1(1490,4450) 1373.43,4450 1342.4,4418.97 1342.4,4377.6 R501.2@1320.83,4356.02 ; F4.1 3124.76,1190.24 2974.14,1340.86 2974.14,1349.14 3260,1635 3260,2890 3090,3060 2435.16,3060 2254.96,3240.2 L500.2 2249.84,3403.63 2124.8,3528.67 2124.8,3684.28 1551.36,4257.72 1483.2,4257.72 1384.9,4356.02 R501.2@1320.83,4356.02
  Bottom Layer w10: C501.P C502.P 1355,4615 1506.57,4615 1530,4591.57 1530,4558.43 1490,4518.43 v1(1490,4450)
NetC602_N: C602.N C603.N C604.N C605.N D600.A1 D600.A2 F5.1 VR600.3 VR600.5 | length 4450.4
  Top Layer w10: v1(440,2510) 461.57,2510 598.39,2646.82 598.39,2667.13 618.98,2687.72 D600.A2 D600.A1 ; F5.1 1994.88,2004.88 v1(2000,2010) 2010.82,2010 2032.62,1988.2 2065.94,1988.2 2080,1974.14 2080,1905 2210,1775 2373.43,1775 C604.N 2445.14,1846.71 2445.14,2348.29 C602.N 2908.43,2350 C603.N 3005,2253.43 C605.N
  Bottom Layer w10: v1(440,2510) 630,2510 720,2420 853.07,2420 VR600.3 ; VR600.5 885.51,2284.21 953.4,2216.33 1793.67,2216.33 v1(2000,2010)
NetD1_1: D1.1 F1.2 J1.2 R1.2 | length 4678.3
  Top Layer w10: D1.1 372.92,1572.86 662.14,1572.86 v1(825,1410) ; v1(2050,1415) 2095.12,1415 F1.2 2415.12,1095 2890,1095 3033,952 R1.2 3280,430 3530,680 3807.8,680 J1.2
  Bottom Layer w10: v1(825,1410) 2045,1410 v1(2050,1415)
NetD2_A: D2.A R1.1 | length 2501.3
  Top Layer w10: v1(2515,545) 2855,545 2955,445 2956.5,445 2970,431.5 R1.1
  Bottom Layer w10: D2.A 585,545 2133.43,545 2138.43,540 2171.57,540 2176.57,545 v1(2515,545)
NetD4_A: D4.A R2.1 | length 2108.7
  Top Layer w10: D4.A 800,895 v1(915,780) ; v1(1037.63,665.35) 1037.63,662.37 1260,440 R2.1
  Bottom Layer w10: v1(915,780) 1029.65,665.35 v1(1037.63,665.35)
NetD5_1: D5.1 F3.1 J2.2 R3.2 | length 3829.4
  Top Layer w10: F3.1 2684.88,630 v1(2865,630) ; J2.2 2553.9,165.9 2776.5,388.5 2776.5,353.5 v1(2845,285)
  Bottom Layer w10: D5.1 701.03,1735 852.75,1583.28 1938.28,1583.28 2090,1431.57 2090,1345.12 F3.1 ; v1(2845,285) 2865,305 v1(2865,630)
NetD6_A: D6.A R3.1 | length 3848.7
  Top Layer w10: D6.A 148.8,858.8 123.8,858.8 55,790 55,145 170,30 2185,30 v1(2270,115) ; v1(2275,210) 2275,310 2355,390 R3.1
  Bottom Layer w10: v1(2270,115) 2270,120 2275,125 v1(2275,210)
NetD7_1: D7.1 F4.2 J3.2 | length 2770.3
  Top Layer w10: J3.2 2110,370 v1(2110,375) ; v1(2155,580) 2155,565 v1(2230,490)
  Bottom Layer w10: D7.1 992.55,1265 1541.84,715.71 2175.71,715.71 F4.2 2235,660 v1(2155,580) ; v1(2110,375) 2195,460 2195,484.14 2224.14,484.14 v1(2230,490)
NetD8_2: D8.2 F5.2 J4.2 R4.2 | length 2772.1
  Top Layer w10: D8.2 850,1955 v1(870,1935) ; v1(850.07,627.01) 895.6,672.54 902.04,672.54 948,718.5 R4.2 ; F5.2 1105.12,1799.73 1065.83,1760.44 1065.83,750.12 1001.5,685.79 1001.5,685.5 997.63,681.63 997.63,622.37 v1(1005,615) 1200.92,419.08 1395.92,419.08 J4.2
  Bottom Layer w10: v1(850.07,627.01) 887.08,590 926.57,590 950,613.43 950,650 955.86,655.86 964.14,655.86 v1(1005,615) ; v1(870,1935) 1000,1805 F5.2
NetD9_K: D9.K R4.1 | length 1004.8
  Top Layer w10: D9.K 326.26,343.74 735.61,343.74 803.55,411.69 803.55,637.05 885,718.5 R4.1
NetD100_2: D100.2 J102.2 | length 1604.9
  Top Layer w50: D100.2 869.06,7032.76 869.06,7239.77 1014.29,7385 1690.55,7385 J102.2
NetD100_3: D100.3 J102.1 | length 1641.1
  Top Layer w10: 1160.95,7446.38 1614.13,7446.38 J102.1
  Top Layer w50: D100.3 986.02,7445 1159.57,7445 1160.95,7446.38
NetD102_A: D102.A R101.1 | length 1789.8
  Top Layer w10: R101.1 1216.36,6223.64 1263.64,6223.64 v1(1265,6225)
  Bottom Layer w10: D102.A 995.59,7193.66 995.59,7104.99 1265,6835.58 v1(1265,6225)
NetD600_K: D600.K L600.1 VR600.2 | length 990.5
  Top Layer w10: D600.K 700.55,2829.45 v1(715,2815) ; v1(1110,2485) 1161.1,2433.9 1196.1,2433.9 1238.35,2391.65 L600.1
  Bottom Layer w10: v1(715,2815) 715,2690 778.98,2626.02 778.98,2530.51 824.49,2485 VR600.2 v1(1110,2485)
NetF100_1: F100.1 J100.1 | length 4077.7
  Top Layer w10: v1(3750,7690) 3751.85,7690 J100.1
  Bottom Layer w10: F100.1 365.49,7370.37 365.49,7568.85 508.29,7711.65 3717.52,7711.65 3739.18,7690 v1(3750,7690)
NetF100_2: F100.2 J103.2 | length 7429.8
  Top Layer w10: J103.2 962.8,675.08 981.5,693.79 981.5,694.08 1045.83,758.4 1045.83,4102.72 1192.6,4249.5 1192.6,5164.21 1293.62,5265.23 1293.62,5453.26 1208.62,5538.27 1208.62,6063.49 1123.61,6148.5 1069.39,6148.5 1020,6197.89 1020,6361.57 1078.43,6420 1143.14,6420 1201.57,6478.43 1201.57,6677.84 1050.31,6829.1 1050.31,7165.43 F100.2
NetJ100_2: J100.2 J104.1 | length 2990
  Top Layer w50: J104.1 983.86,7770 3475,7770 J100.2
NetJ101_1: J101.1 J104.2 RV100.1 | length 844.9
  Top Layer w10: RV100.1 1400,7280.49 1400,7324.82 v1(1399.82,7325) ; v1(1405,7520) 1405,7592.25 J101.1
  Top Layer w50: J104.2 1093.16,7597.25 1165.79,7669.87 1262.2,7669.87 1334.82,7597.25 J101.1
  Bottom Layer w10: v1(1399.82,7325) 1405,7330.18 v1(1405,7520)
NetJ101_2: J101.2 J103.1 RV100.2 | length 10109.5
  Top Layer w10: J103.1 825,545 v1(910,630) ; v1(890,1200) 890,1736.43 931.02,1777.46 931.02,2935.01 724.57,3141.47 724.57,3651.28 960,3886.72 v1(960,5290) ; v1(945,7105) 946.03,7106.03 946.03,7145 1111.03,7310 1140,7310 1254.04,7195.96 RV100.2
  Top Layer w50: J101.2 1660.55,7710 1895.22,7710 2010,7595.22 2010,7414.11 RV100.2
  Bottom Layer w10: v1(890,1200) 890,1165 890.86,1164.14 890.86,1155.86 875,1140 875,736.2 910,701.2 v1(910,630) ; v1(945,7105) 945,6754.62 205,6014.62 205,5565.86 210.86,5560 690,5560 v1(960,5290)
NetR200_1: R200.1 U200.7 | length 177.4
  Top Layer w10: R200.1 1705,6675 U200.7
NetR300_1: R300.1 U300.7 | length 310.7
  Top Layer w10: R300.1 1290.59,5886.61 1290.59,5866.3 1391.42,5765.47 1424.53,5765.47 U300.7
NetR400_1: R400.1 U400.7 | length 459.8
  Top Layer w10: R400.1 1470,5477.2 1470,5180 U400.7
NetR500_1: R500.1 U500.7 | length 1070.8
  Top Layer w10: R500.1 1105,4910 v1(1125,4910)
  Bottom Layer w10: v1(1125,4910) 1590.15,4910 1610.15,4930 1659.85,4930 1679.85,4910 1940,4910 U500.7
NetR501_1: R501.1 VR500.1 VR500.2 | length 1306.4
  Top Layer w10: v1(1135,3800) 1135,4080 v1(1170,4115) ; v1(1305,4175) 1310,4180 R501.1
  Bottom Layer w10: VR500.1 VR500.2 775.43,3390.43 775.43,3440.43 v1(1135,3800) ; v1(1170,4115) 1245,4115 v1(1305,4175)
NetR502_2: R502.2 U500.6 VR500.3 | length 3313.8
  Top Layer w10: R502.2 1528.86,4292.4 1543.54,4307.09 1543.54,4350.65 1610,4417.11 1610,4431.57 1633.43,4455 1718.43,4455 1748.43,4485 1949.14,4485 1970,4464.14 v1(1970,4460) ; v1(1545,4840) 1575,4840 1640,4775 v1(1670,4775)
  Bottom Layer w10: VR500.3 1480.55,4292.4 1520,4292.4 1545,4317.4 1545,4545.15 1550,4550.15 1550,4599.85 1545,4604.85 v1(1545,4840) 1548.43,4840 1618.43,4910 1651.57,4910 1694.5,4867.07 1852.07,4867.07 1895,4824.14 1895,4535 v1(1970,4460) ; v1(1670,4775) 1677.5,4767.5 1832.5,4767.5 U500.6
pads on no net: L200.3 L300.3 L400.3 L500.3 U200.5 U300.5 U400.5 U500.5
copper on no net: | length 131.1
  Top Layer w10: 3954.33,7714.54 3954.33,7715 4085,7715

## Silkscreen, mask and mechanical layers (free items; w line width, h text height)
Mechanical 2:
  circle w0.5: c4048.64,230.66 r81.38
  circle w0.5: c3103.76,230.66 r81.38
  circle w0.5: c2158.87,230.66 r81.38
  circle w0.5: c1213.99,230.66 r81.38
  circle w0.5: c269.11,230.66 r81.38
  circle w0.5: c3103.76,7553.49 r81.38
  circle w0.5: c4048.64,7553.49 r81.38
  circle w0.5: c2158.87,7553.49 r81.38
  circle w0.5: c1213.99,7553.49 r81.38
  circle w0.5: c269.11,7553.49 r81.38
  lines w0.5: 0.25,0.25 0.25,7815.42 4317.5,7815.42 4317.5,0.25 0.25,0.25

## Dimensions
0.25,7815.42 to 4317.5,7815.42 on Top Layer
0.25,7815.42 to 0.25,0.25 on Top Layer

## Text inside footprints (layer, text, board x,y; h text height)
D2: Top Overlay "A" at 448.14,489.38 h39.37; Top Overlay "K" at 448.14,381.11 h39.37; Bottom Overlay "K" at 474.38,381.11 h39.37; Bottom Overlay "A" at 474.38,489.38 h39.37; Mechanical 13 "A" at 526.88,489.38 h39.37; Mechanical 13 "K" at 526.88,381.11 h39.37
D4: Top Overlay "A" at 463.14,884.38 h39.37; Top Overlay "K" at 463.14,776.11 h39.37; Bottom Overlay "K" at 489.38,776.11 h39.37; Bottom Overlay "A" at 489.38,884.38 h39.37; Mechanical 13 "A" at 541.88,884.38 h39.37; Mechanical 13 "K" at 541.88,776.11 h39.37
D6: Top Overlay "A" at 138.14,929.38 h39.37; Top Overlay "K" at 138.14,821.11 h39.37; Bottom Overlay "K" at 164.38,821.11 h39.37; Bottom Overlay "A" at 164.38,929.38 h39.37; Mechanical 13 "A" at 216.88,929.38 h39.37; Mechanical 13 "K" at 216.88,821.11 h39.37
D9: Top Overlay "A" at 123.14,544.38 h39.37; Top Overlay "K" at 123.14,436.11 h39.37; Bottom Overlay "K" at 149.38,436.11 h39.37; Bottom Overlay "A" at 149.38,544.38 h39.37; Mechanical 13 "A" at 201.88,544.38 h39.37; Mechanical 13 "K" at 201.88,436.11 h39.37
D102: Top Overlay "K" at 438.14,7540.36 h39.37; Top Overlay "A" at 438.14,7648.63 h39.37; Bottom Overlay "A" at 464.38,7648.63 h39.37; Bottom Overlay "K" at 464.38,7540.36 h39.37; Mechanical 13 "K" at 516.88,7540.36 h39.37; Mechanical 13 "A" at 516.88,7648.63 h39.37